# Altium PCB Mega2560_Custom.PcbDoc (part 5 of 5)
Units mil, origin at the board's own origin, x right, y up, seen from the top; angles counter-clockwise.
Board outline 4724.41 x 2992.13 mil, 2 copper layers (Top Layer, Bottom Layer), stack 57 mil thick; 197 components, 130 nets, 758 pads, 836 vias.
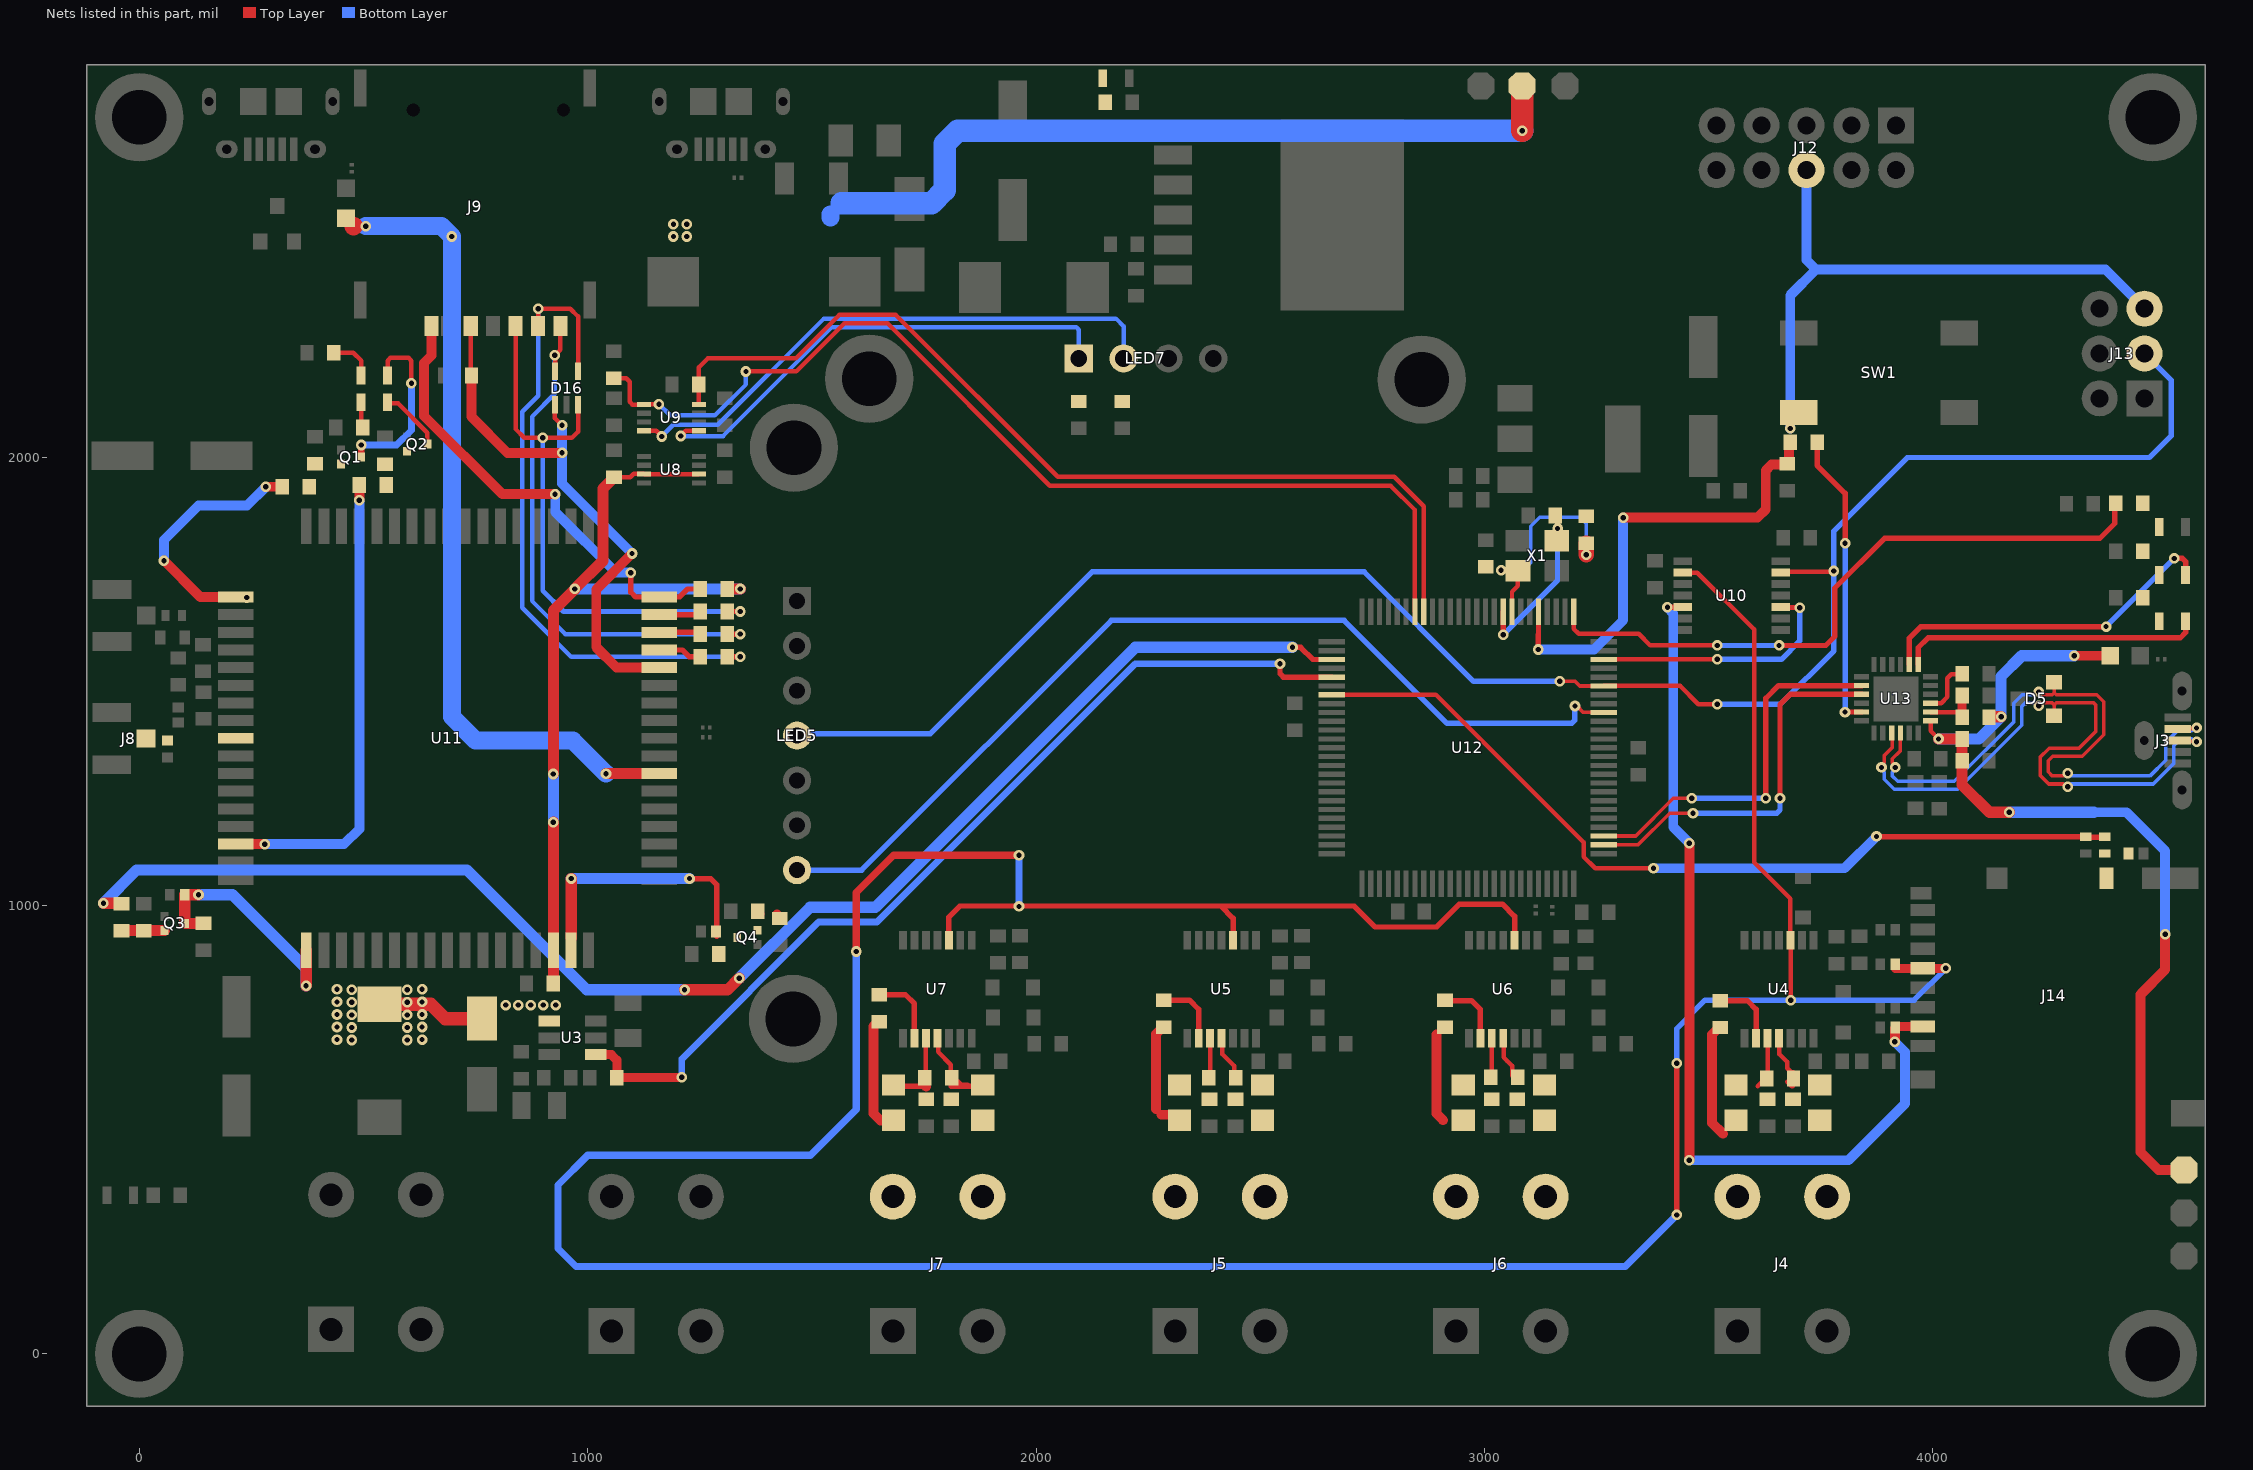
[diagram p3: the nets of this part, all layers, seen from the top]

## Via types
v1: diameter 23.62, hole 11.81, Top Layer to Bottom Layer, 836 vias

## Nets (pads, with @x,y where several pads share a name; then routed paths per layer and width w, separated by ;. In a path a pad name is that pad's centre, name@x,y a point inside that pad or via, vN(x,y) a via of type N, cw(c..) or ccw(c..) an arc to the next point about the centre after c; other vN are vias at no path point) (continued)
NetLED2_1: LED2.1 R7.1
NetLED3_1: LED3.1 R25.1 | length 101.4
  Top Layer w10: R25.1@434,2233 477,2233 494.77,2215.23 LED3.1@494.77,2181.95
NetLED3_2: LED3.2 Q1.3 | length 398.9
  Top Layer w10: LED3.2@553.82,2181.95 553.82,2215.14 559.68,2221 600.96,2221 606.82,2215.14 v1(606.82,2164.95)
  Top Layer w15: Q1.3@494.64,2000 494.82,2000.18 494.82,2026.82 v1(495,2027)
  Bottom Layer w15: v1(495,2027) 573.87,2027 606.82,2059.95 v1(606.82,2164.95)
NetLED4_1: LED4.1 R26.1 | length 55.9
  Top Layer w10: R26.1@494.77,2066 LED4.1@494.77,2121.95
NetLED4_2: LED4.2 Q2.3 | length 160.9
  Top Layer w10: LED4.2@549.82,2121.95 LED4.2@550.82,2120.95 ; LED4.2@553.82,2121.95 555.74,2120.04 576.96,2120.04 642.46,2054.54 642.46,2046.31 ; Q2.3@642.46,2028.95 Q2.3@642.46,2029 ; Q2.3@642.46,2029 642.46,2046.31 ; Q2.3@642.46,2029 642.46,2046.31
NetLED6_1: LED6.1 R41.1
NetLED8_1: LED8.1 R45.1
NetLED9_1: LED9.1 R46.1
NETLIGHT: R27.2 U11.52 | length 552.5
  Top Layer w22: v1(55,1769) 136.05,1687.95 U11.52@214.82,1687.95 ; v1(282.26,1933.95) R27.2@318.82,1933.95
  Bottom Layer w22: v1(55,1769) 55.31,1769.31 55.31,1815.31 132,1892 240.31,1892 v1(282.26,1933.95)
  other v1: 239.77,1686.72 239.77,1686.72
NetQ1_2: Q1.2 R27.1 R28.1
NetQ2_2: Q2.2 R29.1 R30.1
NetQ3_2: Q3.2 R31.1 R32.1 | length 96.5
  Top Layer w25: R31.1@-39.82,943.95 -39.57,944.2 Q3.2@56.54,944.2
NetQ4_2: Q4.2 R33.1 R34.1 | length 15.1
  Top Layer w20: R33.1@1379,987 1379,986 R33.1@1384,981 ; R34.1@1422,981 R34.1@1427,976
NetR10_2: R10.2 U4.2 | length 164.2
  Top Layer w12: R10.2@3526.87,787.95 3585.87,787.95 3605.5,768.31 U4.2@3605.5,690.91
NetR11_2: R11.2 U5.2 | length 163.8
  Top Layer w12: R11.2@2284.82,788.95 2342,788.95 2362.64,768.31 U5.2@2362.64,690.91
NetR16_2: R16.2 U6.2 | length 164.2
  Top Layer w12: R16.2@2911.87,787.95 2970.87,787.95 2990.5,768.31 U6.2@2990.5,690.91
NetR17_2: R17.2 U7.2 | length 164.2
  Top Layer w12: R17.2@1649.82,800.95 1708.82,800.95 1728.46,781.31 U7.2@1728.46,703.91
NetR21_2: R21.2 U11.33 | length 94.4
  Top Layer w10: R21.2@1244.14,1648.58 R21.2@1251.18,1655.62
  Top Layer w12: U11.33@1159.7,1648.58 R21.2@1244.14,1648.58
NetR22_2: R22.2 U11.32 | length 93.1
  Top Layer w10: R22.2@1247.25,1609.21 R22.2@1251.18,1605.28
  Top Layer w12: U11.32@1159.7,1609.21 R22.2@1247.25,1609.21
NetR23_2: R23.2 U11.31 | length 97.6
  Top Layer w12: U11.31@1159.7,1569.84 1211.16,1569.84 1226.05,1554.95 R23.2@1251.18,1554.95
NetR42_1: R42.1 R43.1 U13.8 | length 118.9
  Top Layer w10: U13.8@3994.59,1431.42 4065,1431.42 R42.1@4065,1420
  Top Layer w20: R42.1@4065,1431.42 R43.1@4065,1468.5
NetR44_2: R44.2 U13.9 | length 122.3
  Top Layer w10: U13.9@3994.59,1451.11 3994.76,1451.28 4018.28,1451.28 4032,1465 4032,1507 4040.86,1515.86 4063.86,1515.86 R44.2@4065,1517
NRESET: C40.2 D19.2 Q4.3 U11.16 | length 578.2
  Top Layer w12: v1(1227,1060) 1274,1060 1288,1046 D19.2@1288,931.02
  Top Layer w25: U11.16@963.15,927.42 v1@963.15,1060
  Bottom Layer w25: v1@963.15,1060 v1(1227,1060)
  other v1: 963,1060
PB7: R41.2 U12.26 | length 1473.6
  Top Layer w10: U12.26@3199.04,1654.95 3199.04,1616.73 3209.82,1605.95 3343.82,1605.95 3369.82,1579.95 v1(3518.82,1579.95)
  Top Layer w12: v1(3656.82,1579.95) 3760.95,1579.95 3781,1600 3781,1708 3891.95,1818.95 4371.95,1818.95 4405.48,1852.48 4405.48,1886.48 R41.2@4408,1889
  Bottom Layer w12: v1(3518.82,1579.95) v1(3656.82,1579.95)
PRGM_DTR: C44.1 U13.23 | length 667.9
  Top Layer w12: C44.1@3741.82,2032.95 3741.82,1981.18 3804,1919 v1(3804,1808) ; v1@3800.29,1431.42 U13.23@3841.05,1431.42
  Bottom Layer w12: v1@3804,1431.6 v1(3804,1808)
  other v1: 3803.82,1431.42
PRGM_RX: U12.3 U13.20 | length 845.2
  Top Layer w8: U12.3@3265.97,1154.95 3336.95,1154.95 3420.95,1238.95 v1(3461.82,1238.95)
  Top Layer w12: v1(3627.14,1238.95) 3627.14,1462.1 3655.51,1490.48 U13.20@3841.05,1490.48
  Bottom Layer w12: v1@3461.82,1239.95 3462.32,1239.45 3626.64,1239.45 v1(3627.14,1238.95)
PRGM_TX: U12.2 U13.21 | length 851.7
  Top Layer w8: U12.2@3265.97,1135.26 3342.26,1135.26 3412.95,1205.95 v1(3464.82,1205.95)
  Top Layer w12: v1(3658.82,1238.95) 3658.82,1447.95 3681.67,1470.79 U13.21@3841.05,1470.79
  Bottom Layer w12: v1(3464.82,1205.95) 3651.79,1205.95 3658.82,1212.98 v1(3658.82,1238.95)
PWR12V_EN: R3.2 U3.4 U12.55 | length 2119.5
  Top Layer w12: v1(2543.82,1538.95) 2543.82,1516.95 2551.49,1509.28 U12.55@2659.67,1509.28
  Top Layer w15: R3.2@1065,616 R3.2@1067,614
  Top Layer w20: U3.4@1017.57,667.6 1017.73,667.44 1052.56,667.44 1065,655 R3.2@1065,616 ; R3.2@1067,614 1067.5,614 1070,616.5 1209.5,616.5 v1(1210,617)
  Bottom Layer w15: v1(1210,617) 1210,658 1515.04,963.04 1644.92,963.04 2220.82,1538.95 v1(2543.82,1538.95)
PWRKEY: C41.2 D20.2 Q3.3 U11.1 | length 562.9
  Top Layer w25: v1(132,1024) 101.23,1024 D20.2@101.18,1023.95 101.18,960.59 Q3.3@101.82,959.95 142.95,959.95 C41.2@143,960 ; v1(372,821) 372.3,821.3 U11.1@372.3,900.55
  Bottom Layer w25: v1(132,1024) 208,1024 372,860 v1(372,821)
PWRKEY_EN: R31.2 U12.53 | length 3249.3
  Top Layer w12: v1(2571.82,1575.95) 2571.9,1575.87 2589.9,1575.87 2617.12,1548.65 U12.53@2659.67,1548.65
  Top Layer w25: v1(-80,1005) -40.87,1005 R31.2@-39.82,1003.95 ; v1(1216,812) 1312,812 v1(1338,838)
  Bottom Layer w25: v1(-80,1005) -6,1079 731,1079 998,812 v1(1216,812) ; v1(1338,838) 1496,996 1641.24,996 2221.19,1575.95 v1(2571.82,1575.95)
R\E\S\E\T\: C44.2 J12.6 J13.5 R38.1 SW1.3 U12.30 | length 2391.5
  Top Layer w8: U12.30@3120.06,1654.71 U12.30@3120.3,1654.95
  Top Layer w12: v1(3119.82,1570.95) 3120.06,1571.19 3120.06,1603.8 3120.3,1604.04 U12.30@3120.3,1631.42
  Top Layer w22: v1(3309,1865) 3608.87,1865 3627,1883.13 3627,1970.38 3639.89,1983.27 3665.82,1983.27 3679.32,1996.77 C44.2@3679.32,2023.97 ; C44.2@3678.41,2029.54 C44.2@3681.82,2032.95
  Bottom Layer w22: v1(3119.82,1570.95) 3243.95,1570.95 3309,1636 v1(3309,1865) ; v1@3681.82,2064 3681.82,2097.95 3681.82,2360.95 3738.93,2418.06 ; J12.6@3717.82,2639.95 3717.82,2439.16 3738.93,2418.06 ; J13.5@4471.82,2330.95 4384.71,2418.06 3738.93,2418.06
  other v1: 3681.82,2063.95
RF_ANT: D22.1 J8.1 U11.60
RST_LCD: LED5.7 U12.17 | length 2166.1
  Top Layer w8: v1(3201.82,1444.95) 3206.05,1444.95 3220.46,1430.54 U12.17@3265.97,1430.54
  Bottom Layer w12: LED5.7@1465.82,1082.95 LED5.7@1466.82,1082.95 ; LED5.7@1466.82,1078.95 1610.82,1078.95 2167.82,1635.95 2687.05,1635.95 2916.63,1406.37 3194.21,1406.37 3201.24,1413.4 3201.24,1444.37 v1(3201.82,1444.95)
RXLED: LED9.2 U13.13 | length 675.3
  Top Layer w12: U13.13@3967.17,1537.85 3967.17,1575.17 3989,1597 4551.5,1597 4563.53,1609.03 LED9.2@4563.53,1634
  Top Layer w16: LED9.2@4561.69,1632.16 LED9.2@4563.53,1634
SCK: J13.3 LED5.4 U10.13 U12.20 | length 4074.3
  Top Layer w8: v1(3167.82,1499.95) 3201.82,1499.95 3212.18,1489.59 U12.20@3265.97,1489.59
  Top Layer w10: U12.20@3265.97,1489.59 3436.18,1489.59 3476.82,1448.95 v1(3518.82,1448.95) ; U10.13@3660.07,1742.13 3661.98,1744.04 3780.91,1744.04 v1@3782.82,1745.95
  Bottom Layer w12: LED5.4@1465.82,1382.95 1763.82,1382.95 2124.82,1743.95 2731.79,1743.95 2975.79,1499.95 v1(3167.82,1499.95) ; v1(3518.82,1448.95) 3659.82,1448.95 3778.82,1567.95 3778.82,1834.74 3943.08,1999 4482.87,1999 4531.82,2047.95 4531.82,2170.95 J13.3@4471.82,2230.95
  other v1: 3778.82,1745.95
SCK_3.3V: D27.1 J14.5 U4.10 U5.10 U6.10 U7.10 U10.2 | length 8243.5
  Top Layer w10: U10.2@3441.57,1742.13 3474.64,1742.13 3601,1615.77 3601,1096.15 3682.27,1014.88 U4.10@3682.27,922.41 3683,921.68 v1(3683,789)
  Top Layer w12: U7.10@1805.23,909.41 U7.10@1805.23,922.41 1805.23,974.36 1829.82,998.95 1961.82,998.95 2411.82,998.95 ; U5.10@2439.41,909.41 U5.10@2439.41,922.41 2439.41,971.36 2411.82,998.95 ; U6.10@3067.27,909.41 U6.10@3067.27,922.41 3067.27,975.73 3040,1003 2944,1003 2893,952 2756,952 2709.05,998.95 2411.82,998.95 ; v1(3428.82,309.95) v1(3428.82,647.95)
  Top Layer w16: v1(1598.82,897.51) 1598.82,1028.95 1681.82,1111.95 v1(1961.82,1111.95)
  Top Layer w20: D27.1@3916.74,859.96 J14.5@3977.52,859.97 v1(4028.82,859.95)
  Bottom Layer w12: v1(3428.82,647.95) 3428.82,725.82 3492,789 v1(3683,789) 3957.87,789 v1(4028.82,859.95)
  Bottom Layer w16: v1(1598.82,897.51) 1598.82,544.89 1496.88,442.95 999.88,442.95 933.82,376.89 933.82,234.95 973.82,194.95 3313.82,194.95 v1(3428.82,309.95) ; v1(1961.82,997.95) v1(1961.82,1111.95)
SCL_3.3V: LED7.1 R36.1 U9.5 | length 1099.8
  Top Layer w10: v1(1207.5,2046.95) 1218.97,2058.42 U9.5@1247.85,2058.42
  Bottom Layer w10: v1(1207.5,2046.95) 1301.82,2046.95 1544.82,2289.95 2089.14,2289.95 2095,2284.09 LED7.1@2095,2220
SCL_5V: R40.1 U9.8 U12.43 | length 2159.5
  Top Layer w10: U9.8@1247.85,2117.48 1247.85,2161.85 R40.1@1248,2162 1248,2200 1267.91,2219.91 1463.91,2219.91 1561,2317 1687,2317 2048,1956 2798.61,1956 2864.4,1890.21 U12.43@2864.4,1654.95
SD_CS: U10.10 U12.23 | length 570.5
  Top Layer w10: U12.23@3265.97,1548.65 v1@3518.12,1548.65
  Top Layer w12: U10.10@3660.07,1665.36 3660.78,1664.65 3702.12,1664.65 v1(3702.82,1663.95)
  Bottom Layer w12: v1(3518.82,1548.95) 3661.82,1548.95 3702.82,1589.95 v1(3702.82,1663.95)
SD_CS_3.3V: D25.1 J14.2 U10.5 | length 2055
  Top Layer w12: v1(3407.82,1664.95) 3408.03,1665.15 3441.37,1665.15 U10.5@3441.57,1665.36
  Top Layer w20: D25.1@3920.95,730.05 J14.2@3977.52,730.05
  Top Layer w22: v1(3456.82,431.95) v1(3456.82,1138.81) ; v1(3915,696) D25.1@3915,726.27
  Bottom Layer w22: v1(3407.82,1664.95) 3407.82,1664.51 3420.82,1651.51 3420.82,1174.81 v1(3456.82,1138.81) ; v1(3456.82,431.95) 3811.95,431.95 3938,558 3938,673 v1(3915,696)
SD_DET: D29.1 J14.SW-A R47.1
SDA_3.3V: LED7.2 R37.1 U9.4 | length 1262.7
  Top Layer w10: U9.4@1125.8,2058.42 1152.85,2058.42 1165,2046.27 v1(1165,2046)
  Bottom Layer w10: v1(1165,2046) 1165,2046.44 1190.51,2071.95 1289.82,2071.95 1526.82,2308.95 2178.05,2308.95 2195,2292 LED7.2@2195,2220
SDA_5V: R39.1 U9.1 U12.44 | length 2348.5
  Top Layer w10: R39.1@1058,2176 1086,2176 1094,2168 1094,2123.07 1099.86,2117.21 U9.1@1125.8,2117.21 ; U9.1@1126.27,2117.95 v1(1158.82,2117.95) ; v1(1352.82,2190.95) 1464.95,2190.95 1571.95,2297.95 1668.98,2297.95 2030.61,1936.32 2790.45,1936.32 2844.71,1882.06 U12.44@2844.71,1654.95
  Bottom Layer w10: v1(1158.82,2117.95) 1183.82,2092.95 1283.82,2092.95 1352.82,2161.95 v1(1352.82,2190.95)
SDMMC_DET: R47.2 R48.1 U12.57 | length 1932.5
  Top Layer w10: U12.57@2659.67,1470.17 2891.6,1470.17 3220.82,1140.95 3220.82,1108.95 3246.82,1082.95 v1(3376.82,1082.95)
  Top Layer w12: v1(3874,1154) 3874.37,1153.63 4339.78,1153.63 4340.96,1152.45 R47.2@4382.96,1152.45
  Bottom Layer w22: v1(3376.82,1082.95) 3802.95,1082.95 v1(3874,1154)
SIM_CLK: D16.5 J9.C3 R22.1 | length 1199.5
  Top Layer w10: v1(926.82,2226.95) 926.82,2227.31 939.13,2239.62 J9.C3@939.13,2292.45 ; D16.5@927.23,2191.35 v1@927.23,2226.95
  Top Layer w12: R22.1@1311.18,1605.28 v1(1340.38,1605.28)
  Bottom Layer w10: v1(926.82,2226.95) 926.82,2140.95 875.82,2089.95 875.82,1679.18 949.72,1605.28 v1(1340.38,1605.28)
SIM_DATA: D16.4 J9.C7 R23.1 | length 1498.7
  Top Layer w10: J9.C7@889.82,2293.15 v1(889.82,2330.95) 961.05,2330.95 978.41,2313.59 D16.4@978.41,2191.35
  Top Layer w12: R23.1@1311.18,1554.95 v1(1340.38,1554.95)
  Bottom Layer w10: v1(889.82,2330.95) 889.82,2136.95 853.82,2100.95 853.82,1663.95 962.82,1554.95 v1(1340.38,1554.95)
SIM_DET: J9.CD R24.2 U11.34 | length 1047.2
  Top Layer w12: v1(1096,1742.31) 1096,1699 1107.05,1687.95 U11.34@1159.7,1687.95 1204.95,1687.95 1222.95,1705.95 R24.2@1251.18,1705.95
  Top Layer w22: J9.CD@651.73,2292.45 651.73,2226.85 635,2210.13 635,2091.7 809.3,1917.4 v1(927.27,1917.4)
  Bottom Layer w22: v1(927.27,1917.4) 927.58,1917.09 927.58,1877.42 1062.69,1742.31 v1(1096,1742.31)
SIM_RST: D16.3 J9.C2 R21.1 | length 1272.9
  Top Layer w10: J9.C2@839.13,2292.45 839.13,2062.64 858.82,2042.95 v1(899.82,2042.95) 964.82,2042.95 978.41,2056.54 D16.3@978.41,2116.55
  Top Layer w12: R21.1@1311.18,1655.62 v1(1340.38,1655.62)
  Bottom Layer w10: v1(899.82,2042.95) 899.82,1701.95 924.39,1677.39
  Bottom Layer w12: 924.39,1677.39 946.16,1655.62 v1(1340.38,1655.62)
SIM_VDD: C34.2 D16.1 J9.C1 U11.30 | length 1243.1
  Top Layer w10: J9.C1@739.13,2292.45 739.13,2183.64 C34.2@740.82,2181.95 ; D16.1@927.23,2116.55 927.03,2116.34 927.03,2086.74 v1(942.82,2070.95)
  Top Layer w22: C34.2@740.82,2181.95 740.82,2089.95 821.32,2009.45 v1(942.82,2009.45) ; v1(1099,1785) 1019,1705 1019,1576 1064.53,1530.47 U11.30@1159.7,1530.47
  Bottom Layer w22: v1(942.82,2070.95) v1(942.82,2009.45) 942.82,1941.18 v1(1099,1785)
STATUS: R29.2 U11.66 | length 1057.2
  Top Layer w22: U11.66@214.82,1136.77 v1(280,1136.77) ; v1(490.82,1903.95) R29.2@490.82,1937.95
  Bottom Layer w22: v1(280,1136.77) 456.64,1136.77 490.82,1170.95 v1(490.82,1903.95)
SW_12V: D6.2 L1.1 U3.1 | length 279.7
  Top Layer w30: L1.1@535.82,779.93 650.07,779.93 682.31,747.69 D6.2@763.82,747.69 763.82,735.46 D6.2@782.29,717
  other v1: 474,700 597.65,700 441,701 630.65,701 474,728 597.65,728 441,729 630.65,729 474,756 597.65,756 441,757 630.65,757 817,778 845,778 873,778 901,778 929,778 474,784 597.65,784 441,785 630.65,785 474,812 597.65,812 441,813 630.65,813
TH1_CON+: FB3.1 J4.4 | length 2.8
  Top Layer w40: FB3.1@3747.82,520.95 FB3.1@3748.82,519.95 ; J4.4@3762.82,351.95 J4.4@3763.82,350.95
TH1_CON-: FB2.1 J4.2 R10.1 | length 256.1
  Top Layer w22: R10.1@3525.82,727.95 3523.32,727.95 3507.42,712.05 3507.42,515.22 3531.64,491
TH1_T+: C15.2 C17.1 FB3.2 U4.4 | length 124.1
  Top Layer w10: U4.4@3657.67,689.92 3657.67,668.33 3674.91,651.09 3674.91,636.95 3683.88,627.97 3688,627.97 3680.05,627.97 3680.05,616.46 C15.2@3687.89,608.62 ; C15.2@3675.32,606.95 3685.32,596.95 C15.2@3687.82,596.95
TH1_T-: C11.2 C15.1 FB2.2 U4.3 | length 103.2
  Top Layer w10: 3608.87,596.91 3631.09,619.13 U4.3@3631.09,690.91
TH2_CON+: FB7.1 J6.4
TH2_CON-: FB6.1 J6.2 R16.1 | length 200
  Top Layer w22: 2892.62,535.95 2892.62,712.63 ; 2893,535.95 2907.7,521.25 ; R16.1@2909.32,728.95 R16.1@2911.82,728.95
TH2_T+: C25.2 C27.1 FB7.2 U6.4 | length 93.8
  Top Layer w10: U6.4@3042.67,689.92 3042.67,661.15 3050.66,653.16 3061.56,642.25 3061.56,619.95 C25.2@3072.89,608.62
TH2_T-: C23.2 C25.1 FB6.2 U6.3 | length 73.9
  Top Layer w10: C25.1@3016.09,617 U6.3@3016.09,690.91
TH3_CON+: FB5.1 J5.4 | length 4.8
  Top Layer w40: J5.4@2504.82,354.35 J5.4@2508.22,350.95
TH3_CON-: FB4.1 J5.2 R11.1 | length 249.7
  Top Layer w22: 2267,546.18 2267,713.63 2282.32,728.95 R11.1@2284.82,728.95 ; 2279.89,533.29 2304.84,533.29 2316.12,522 FB4.1@2316.12,521.25
  Top Layer w40: J5.2@2308.22,350.95 J5.2@2319.82,362.55
TH3_T+: C16.2 C18.1 FB5.2 U5.4 | length 88.1
  Top Layer w10: U5.4@2414.8,689.92 2415.08,689.65 2415.08,668.78 2441.57,642.29 2441.57,623.43 C16.2@2449,616
TH3_T-: C14.2 C16.1 FB4.2 U5.3 | length 88.2
  Top Layer w10: U5.3@2388.23,703.91 2388.23,616.77 C16.1@2389,616
TH4_CON+: FB9.1 J7.4 | length 0.6
  Top Layer w40: J7.4@1880.42,350.95 J7.4@1880.62,351.15 ; FB9.1@1880.62,520.75 FB9.1@1880.82,520.95
TH4_CON-: FB8.1 J7.2 R17.1 | length 263.4
  Top Layer w22: 1637.02,548.81 1637.02,535.95 1652.72,520.25 FB8.1@1681.12,520.25 ; 1637,548.84 1637,730.63 1647.32,740.95 R17.1@1649.82,740.95
  Top Layer w40: J7.2@1680.42,350.95 J7.2@1681.12,351.65
TH4_T+: C26.2 C28.1 FB9.2 U7.4 | length 199.4
  Top Layer w8: FB9.2@1878.08,596.95 FB9.2@1880.82,599.69
  Top Layer w10: U7.4@1779.64,690.91 1781.24,689.31 1781.24,673.76 1809.86,645.14 1809.86,618.14 C26.2@1812,616 1812,598.13 1810.82,596.95 ; C26.2@1824.99,608.62 1833.66,599.95 1847.8,599.95
  Top Layer w12: 1810.82,596.95 1841.82,596.95 ; 1847.8,596.95 FB9.2@1878.08,596.95
TH4_T-: C24.2 C26.1 FB8.2 U7.3 | length 136.9
  Top Layer w10: C26.1@1754.05,616 U7.3@1754.05,690.91
  Top Layer w12: FB8.2@1681.82,596.95 1741.82,596.95
  Top Layer w22: 1753.41,597.36 1754.82,595.95
TXLED: LED8.2 U13.14 | length 781.3
  Top Layer w12: U13.14@3947.35,1537.72 3947.35,1596.35 3973,1622 v1(4386,1622) ; v1(4538,1774) 4556.5,1774 4563.53,1766.97 LED8.2@4563.53,1737
  Bottom Layer w12: v1(4386,1622) v1(4538,1774)
USB_D_N: D5.2 J3.2 U13.4 | length 1389.1
  Top Layer w8: 3909.51,1318.49 3909.51,1327.07 3926.82,1344.38 3926.82,1383.33 U13.4@3927.67,1384.18 ; v1(4235.82,1476.26) 4240.05,1476.26 4246.36,1469.95 4265.51,1469.95 4270.19,1474.63 ; D5.2@4270.19,1498.35 4270.19,1474.63 ; v1(4300.82,1295.26) 4296.6,1295.26 4290.28,1288.95 4265.82,1288.95 4256.82,1297.95 4256.82,1322.95 4266.82,1332.95 4333.28,1332.95 4380.82,1380.49 4380.82,1454.72 4365.59,1469.95 4274.88,1469.95 4270.19,1474.63 ; J3.2@4545.82,1393.54 4547.08,1394.8 4586.56,1394.8 v1(4587.82,1396.05)
  Bottom Layer w8: v1(3915.82,1307.95) 3915.82,1303.72 3909.51,1297.41 3909.51,1288.82 3921.39,1276.95 4047.82,1276.95 4180,1409.13 4180,1451.13 4198.82,1469.95 4225.28,1469.95 ; v1@4308.35,1288.95 4483.82,1288.95 4518.82,1323.95 4518.82,1363.4 4545.16,1389.74 4577.28,1389.74 4583.6,1396.05 v1(4587.82,1396.05)
USB_D_P: D5.1 J3.3 U13.3 | length 1418.9
  Top Layer w8: 3891.51,1318.49 3891.51,1334.53 3908.82,1351.84 3908.82,1383.33 U13.3@3907.98,1384.18 ; v1(4235.82,1445.64) 4240.05,1445.64 4246.36,1451.95 4265.51,1451.95 4270.19,1447.26 ; D5.1@4270.19,1423.55 4270.19,1447.26 ; v1(4300.82,1264.64) 4296.6,1264.64 4290.28,1270.95 4258.37,1270.95 4238.82,1290.49 4238.82,1330.4 4259.37,1350.95 4325.82,1350.95 4362.82,1387.95 4362.82,1447.26 4358.14,1451.95 4274.88,1451.95 4270.19,1447.26 ; J3.3@4545.82,1367.95 4547.08,1366.69 4586.56,1366.69 v1(4587.82,1365.43)
  Bottom Layer w8: v1(3885.2,1307.95) 3885.2,1303.72 3891.51,1297.41 3891.51,1281.37 3913.93,1258.95 4055.28,1258.95 4198,1401.67 4198,1443.67 4206.28,1451.95 4225.28,1451.95 ; v1@4308.35,1270.95 4491.28,1270.95 4536.82,1316.49 4536.82,1355.95 4552.62,1371.74 4577.28,1371.74 4583.6,1365.43 v1(4587.82,1365.43)
USB_PRGM: C49.1 C50.1 F3.2 P3.1 R42.2 U13.7 | length 2064.7
  Top Layer w10: U13.7@3994.59,1411.74 3994.59,1389.41 v1(4012.5,1371.5)
  Top Layer w22: v1@4315.03,1556.97 F3.2@4395.36,1556.95 ; 4462.82,801.77 4462.82,449.95 4502.82,409.95 P3.1@4559.82,409.95 ; 4463.31,801.77 4463.62,801.77 4464.36,802.52 4464.36,803.31 4517.82,856.77 v1(4517.82,935.95)
  Top Layer w25: v1(4012.5,1371.5) C49.1@4065,1371.5 C50.1@4065,1323 4065,1269 4126,1208 v1(4170,1208) ; R42.2@4125,1420 4126,1421 v1(4152,1421)
  Bottom Layer w22: 4359,1208 4432,1208 4517.82,1122.18 v1(4517.82,935.95)
  Bottom Layer w25: v1(4012.5,1371.5) 4102.5,1371.5 v1(4152,1421) 4152,1511 4198,1557 v1(4315,1557) ; v1(4170,1208) 4359,1208
USB_VBUS: F2.2 P2.1 U11.24 | length 3541.9
  Top Layer w22: v1(1040.82,1293.95) v1@1040.97,1294.1 ; U11.24@1159.55,1294.1 U11.24@1159.7,1294.25
  Top Layer w25: v1@1040.97,1294.1 U11.24@1159.55,1294.1
  Top Layer w40: F2.2@478,2514 F2.2@479,2515
  Top Layer w50: v1(3083.82,2727.95) P2.1@3083.82,2827.95
  Bottom Layer w40: v1(505,2515) 674,2515 v1(697,2492) 697,1421 750,1368 966.77,1368 v1(1040.82,1293.95) ; 1541.5,2534.5 1541.5,2541.5
  Bottom Layer w50: 1566,2566 1766.71,2566 1796,2595.29 1796,2698.66 1825.29,2727.95 v1(3083.82,2727.95)
  other v1: 1191.18,2491.95 1221,2491.95 1191.18,2519 1221,2519
VDD_EXT: C29.1 C35.2 R24.1 U8.3 U8.6 U11.15 | length 1775.6
  Top Layer w10: C29.1@1058.82,1954.95 1094.82,1954.95 1102.46,1962.58 1125.32,1962.58 U8.3@1125.8,1962.11 U8.6@1247.85,1962.11
  Top Layer w25: C35.2@923.48,826 U11.15@923.48,900.55 v1(923.48,1185.61) ; v1(923.48,1293.29) 923.48,1657.48 v1@971,1705 ; v1(971,1705.95) 1033.82,1768.77 1033.82,1929.95 1053.82,1949.95 1053.82,1952.45 1056.32,1954.95 C29.1@1058.82,1954.95 ; R24.1@1311.18,1705.95 v1(1340.38,1705.95)
  Bottom Layer w25: v1(923.48,1185.61) v1(923.48,1293.29) ; v1@971.95,1705.95 v1(1340.38,1705.95)
XTAL1: C42.2 R35.2 U12.34 X1.1 | length 338.1
  Top Layer w12: U12.34@3041.56,1654.95 3041.66,1654.85 3041.66,1604.11 v1(3041.82,1603.95)
  Bottom Layer w12: v1(3041.82,1603.95) 3162.82,1724.95 3162.82,1809.95 v1(3162.82,1840.82)
XTAL2: C43.1 R35.1 U12.33 X1.3 | length 485.3
  Top Layer w10: U12.33@3061.25,1654.95 3061.25,1699.54 3074.52,1712.81 X1.3@3074.52,1746.48
  Top Layer w35: v1(3227,1782) R35.1@3227,1808
  Bottom Layer w8: v1(3036.82,1747.95) 3085.82,1747.95 3102.82,1764.95 3102.82,1845.82 3123,1866 3213,1866 3227,1852 v1(3227,1782)
pads on no net: J1.2 J1.3 J1.4 J2.4 J3.4 J4.1 J4.3 J5.1 J5.3 J6.1 J6.3 J7.1 J7.3 J9.C6 J9.MH J11.1 J11.3 J12.7 J12.8 J14.1 J14.8 J15.1 J15.3 SW1.2 SW1.4 U3.6 U4.6 U4.13 U5.6 U5.13 U6.6 U6.13 U7.6 U7.13 U10.6 U10. U11.3 U11.4 U11.5 U11.6 U11.7 U11.8 U11.11 U11.12 U11.13 U11.14 U11.19 U11.20 U11.21 U11.22 U11.23 U11.25 U11.26 U11.35 U11.36 U11.37 U11.38 U11.40 U11.41 U11.42 U11.43 U11.44 U11.47 U11.48 U11.49 U11.50 U11.51 U11.67 U11.68 U12.1 U12.4 U12.5 U12.6 U12.7 U12.8 U12.9 U12.12 U12.13 U12.14 U12.15 U12.18 U12.24 U12.25 U12.27 U12.28 U12.29 U12.35 U12.36 U12.37 U12.38 U12.39 U12.40 U12.41 U12.42 U12.47 U12.48 U12.49 U12.50 U12.51 U12.52 U12.58 U12.59 U12.60 U12.63 U12.64 U12.65 U12.66 U12.67 U12.68 U12.69 U12.70 U12.79 U12.82 U12.83 U12.84 U12.85 U12.86 U12.87 U12.88 U12.89 U12.94 U12.95 U13.1 U13.10 U13.11 U13.12 U13.15 U13.16 U13.17 U13.18 U13.19 U13.22 U13.24
copper on no net:
  other v1: 1214,559 4230.05,684.77 3943,1685 3943,1792 239.77,2622.72

## Polygon pours and split planes (outlines as drawn)
GND on Top Layer "c" (solid, remove dead copper, pour order 0): -61,-66 -61,2821 4566.82,2821 4566.82,-66
GND on Bottom Layer "GND_L02_P003" (solid, remove dead copper, pour order 3): -61,-66 -61,2821 4566.82,2821 4566.82,-66

## Other copper
Top Layer:
  rectangle net NetD7_1: 1507,2335 1764,2492
  rectangle net GND: 2195.82,2818.95 2296.82,2869.95
  rectangle net NetLED2_1: 2107,2767.95 2172.82,2869.95
  region net GSM_PWR: 2264,2812 2194,2812 2194,2768 2264,2768
  rectangle net 5V: 1856,2474 1981,2640
  rectangle net 5V: 1775,2474 1863,2687.52
  rectangle net 5V: 1855,2565 2036,2687.52
  rectangle net GND: 1816,2695.95 2070,2866.95
  rectangle net 5V: 1642,2656 1805,2743
  region net GND: 1927,2217 1927,2442.82 1822,2442.82 1822,2217
  rectangle net NetD7_1: 2040,2445 2106,2492
  rectangle net USB_VBUS: 437,2493 526,2556
  region net NetLED9_1: 4517,1610 4517,1704 4452,1704 4452,1610
  rectangle net GND: 4513,1435 4591,1580
  rectangle net NetJ13_2: 4309,2084 4421,2185
  rectangle net GND: 3865,710 3897,964
  rectangle net NetQ4_2: 1364,934 1451.18,1004.75
  rectangle net GND: 1364,892 1451,928.95
  rectangle net GND: 1211,872 1264,956
  rectangle net TH4_CON-: 1626,717 1673,757
  rectangle net TH3_CON-: 2256,705 2307,745
  rectangle net TH1_CON-: 3496.42,704 3548.17,744
  rectangle net 3.3V: 1841.82,633 1894.96,674
  rectangle net NetD15_2: 1848.14,679.95 1920.14,769.95
  rectangle net D\R\D\Y\4\: 1971,671 2015,771
  rectangle net 3.3V: 2476,633 2529.14,674
  rectangle net NetD11_2: 2481.14,679.95 2553.14,769.95
  rectangle net D\R\D\Y\3\: 2604,671 2648,771
  rectangle net TH2_CON-: 2881.62,705 2936,745
  rectangle net 3.3V: 3103.86,633 3157,674
  rectangle net NetD14_2: 3109,681 3181,771
  rectangle net D\R\D\Y\2\: 3231,671 3275,771
  rectangle net CS2: 3213,797 3270,841
  rectangle net GND: 3782.86,596.94 3888,621
  rectangle net GND: 3882,596.94 3928,672.94
  rectangle net TH1_T+: 3666.82,614 3709.18,641.95
  rectangle net TH2_T+: 3051.82,617 3092.86,635
  rectangle net TH4_T+: 1789.82,617.07 1830.86,635.07
  rectangle net TH3_T+: 2423.96,616 2465,634
  rectangle net SCK_3.3V: 3905,849.96 3939,883.96
  rectangle net GND: 2997.82,488.95 3093.82,543
  rectangle net GND: 2369,484.95 2465,524.95
  rectangle net SW_12V: 425,689 798,826
  rectangle net 5V: 388.18,427 685,647
  region net GND: 1189,806 1055,806 1055,744 1189,744
  rectangle net 5V: 1080,658 1161,693
  region net 5V: 1161,734 1055,734 1055,684 1161,684
  region net SW_12V: 943,793 788,793 788,728 943,728
  region net FB_12V: 920,597 920,681 881,681 881,597
  rectangle net GND: 933,516 1024,636
  rectangle net 12V: 700,621 827,649
  rectangle net FB_12V: 834,650 940,681
  rectangle net GND: 4459,1033 4594,1167
  rectangle net GND: 4412.82,1151 4594,1323.95
  rectangle net GSM_PWR: 352,2087 403,2285
  rectangle net GSM_PWR: 192,2067 453,2133
  rectangle net NRESET: 1275,872 1344,957
  rectangle net USB_PRGM: 3983.82,1360 4033,1418
  rectangle net NetD3_1: 4503,1409 4577,1428
  rectangle net GND: 1608,2526 1757.85,2642
  rectangle net GND: 3303,1336 3363,1372
  rectangle net 5V: 2526,1371 2597,1408
  region net 3.3V: 2334.18,2096.95 2063,2096.95 2063,2006 2334.18,2006
  rectangle net 3.3V: 2251,2039 2334.18,2269
  region net SDA_3.3V: 2232.82,2270 2157,2270 2157,2105 2232.82,2105
  region net SCL_3.3V: 2130.82,2270 2060,2270 2060,2105 2130.82,2105
  rectangle net 5V: 3649,1758.95 3693,1943
  region net NetLED8_1: 4517,1713 4517,1811 4452,1811 4452,1713
  rectangle net CP_VDD: 4386,1665 4425,1810
  rectangle net NetD3_1: 4440,1536 4505.67,1580
  rectangle net XTAL2: 3209.5,1792 3244.5,1828
  rectangle net XTAL1: 3133,1848 3248,1891.95
  rectangle net NetD2_1: 439,2577 485,2641
  rectangle net GND: 1144.82,2582 1332,2643
  rectangle net NetD1_1: 1409,2621 1462,2658
  rectangle net NetD1_1: 1337,2582 1462,2650
  rectangle net NetF1_2: 1522,2585 1596,2742
  rectangle net 5V: 1038,2219 1211,2317
  rectangle net 5V: 1281,2113 1332,2208
  rectangle net GSM_PWR: 2062,2319 2246,2390
  rectangle net NetD1_1: 1337,2613 1363,2723
  rectangle net GSM_PWR: 1053.82,2335 1252,2465.95
  rectangle net USB_VBUS: 680,2477 1237,2534
  rectangle net VDD_EXT: 1021,1920.95 1080.82,1976.95
  rectangle net 3.3V: 2962,1996 3303,2079
  rectangle net 5V: 2978.82,1904 3235,1984.95
  rectangle net GND: -106,1685 32,2176.71
  rectangle net GND: 78,677 352,790
  rectangle net 12V: 723,590 799,649
  rectangle net 3.3V: 3358.94,1757.95 3466.82,1797
  rectangle net 3.3V: 3259,1905.95 3525,2134
  rectangle net GSM_PWR: 100,1774 168,1901
  rectangle net NetD7_1: 2261,2574 2387,2636
  rectangle net 5V: 1423,1638 1511,1718
  rectangle net GSM_PWR: 100,1888 254,2134
  rectangle net 3.3V: 4293.82,1103.76 4354.82,1134.76
  rectangle net GND: 276,703 352,813
  rectangle net GND: 78,694 301,849.95
  rectangle net GND: 3000,2161 3557.82,2683.95
  rectangle net GND: 2769.82,2323.95 3031.82,2683.95
  region net GND: -61.18,409.95 -93.18,409.95 -93.18,329.95 -61.18,329.95
  region net NetLED1_1: 50,376 -23.18,376 -23.18,329.95 50,329.95
  rectangle net 5V: 679,420.95 865.82,510
  rectangle net 5V: 1124,2138 1211,2317
  region net GND: 1351.82,2089.95 1284.82,2089.95 1284.82,2051.95 1351.82,2051.95
  rectangle net GND: 4549.82,544.95 4591.82,1044.95
  rectangle net GND: 2445.82,2290 2821.82,2798.95
  rectangle net GND: 4412.82,1299.95 4496.82,1399.95
  rectangle net GND: 3545,1907.95 3603,2182.95
  rectangle net GND: 3000,2089.95 3235,2214.95
  rectangle net 3.3V: 3027.82,1995.95 3309.82,2070.95
  rectangle net 3.3V: 3109.04,898 3244,947
  rectangle net GND: 992.82,2115.95 1076.82,2146.95
  rectangle net GND: 992.82,2115.95 1027.82,2406.95
  rectangle net GND: 497.82,2360 1027.82,2406.95
  rectangle net GND: 347.82,2308.95 620,2406.95
  rectangle net GND: 982,2759 1831,2816.95
  rectangle net GND: 1144.82,2638.95 1255.82,2773.95
  rectangle net GND: 135.97,2640.95 250.82,2741.95
  region net GND: 538,2741.95 366.03,2741.95 366.03,2646 538,2646
  rectangle net GND: 135.97,2727.95 539,2816.95
  rectangle net 5V: 3226.82,1012.95 3337,1070
  rectangle net 5V: 3192.82,1012.95 3231.82,1077.95
  rectangle net NetLED6_1: 4453,1820 4515,1907
  rectangle net NetJ13_2: 4340,1873 4381,2175
  rectangle net GND: 3454.82,2161.52 3785.82,2534.95
  rectangle net TH1_CON+: 3718.42,298.95 3820,546.95
  rectangle net TH1_CON+: 3711.42,298.95 3736.42,405.95
  region net TH1_CON-: 3586.42,546.95 3496.42,546.95 3496.42,298.95 3586.42,298.95
  region net TH1_CON-: 3616.22,405.95 3578,405.95 3578,298.95 3616.22,298.95
  rectangle net TH2_CON+: 3104.62,298.95 3194.62,546.95
  rectangle net TH2_CON+: 3083.62,298.95 3108.62,405.95
  region net TH2_CON-: 2988.42,546.95 2881.62,546.95 2881.62,298.95 2988.42,298.95
  region net TH2_CON-: 2988.42,405.95 2963.42,405.95 2963.42,298.95 2988.42,298.95
  rectangle net TH4_CON+: 1849.02,298.95 1939.02,546.95
  rectangle net TH4_CON+: 1828.02,298.95 1853.02,405.95
  region net TH4_CON-: 1716.02,546.95 1626.02,546.95 1626.02,298.95 1716.02,298.95
  region net TH4_CON-: 1732.82,405.95 1707.82,405.95 1707.82,298.95 1732.82,298.95
  region net TH3_CON-: 2362.62,405.95 2337.62,405.95 2337.62,298.95 2362.62,298.95
  region net TH3_CON-: 2345.82,546.95 2255.82,546.95 2255.82,298.95 2345.82,298.95
  rectangle net TH3_CON+: 2457.82,298.95 2482.82,405.95
  rectangle net TH3_CON+: 2477.82,298.95 2567.82,545
  rectangle net 5V: 3597,1758.95 3682.82,1841.95
  region net GND: 2952.82,1984.95 2887,1984.95 2887,1788.95 2952.82,1788.95
  rectangle net XTAL2: 2984.82,1721.95 3102.82,1769.95
  rectangle net GND: 2900.82,1788.95 3102.21,1859
  rectangle net GND: 3097.82,1840.95 3115.82,1891.95
  rectangle net GND: 3046.21,1788.95 3102.21,1891.95
  rectangle net XTAL1: 3132.82,1788.95 3188.82,1891.95
  rectangle net 5V: 2978.82,1878 3038,1917.95
  rectangle net R\E\S\E\T\: 3649,2067.95 3783,2129.95
  rectangle net R\E\S\E\T\: 3649,1970 3703.82,2076.95
  rectangle net GND: 3824.82,1194.95 3856.82,1354.95
  rectangle net GND: 3824.82,1194.95 4034.82,1235.95
  rectangle net GND: 3611,490 3707,530
  region net TH1_T-: 3652.87,641.95 3531.87,641.95 3531.87,552.95 3652.87,552.95
  rectangle net TH1_T+: 3666.82,552.95 3776,624.95
  region net TH2_T-: 3037.87,637 2916.87,637 2916.87,553 3037.87,553
  rectangle net TH2_T+: 3051.82,553 3161,624.95
  region net TH3_T-: 2410,634 2289,634 2289,552 2410,552
  rectangle net TH3_T+: 2423.96,552 2536,624.95
  rectangle net TH4_T+: 1789.82,553 1907.82,624
  region net TH4_T-: 1775.82,637 1654.82,637 1654.82,553 1775.82,553
  rectangle net 3.3V: 2481.82,897 2612,948
  rectangle net GND: 1735.4,484.95 1831.4,524.95
  rectangle net 3.3V: 1847.82,894.95 2021,948
  rectangle net CP_VDD: 3941.82,1259.95 4036.82,1298.95
  rectangle net CP_VDD: 3994.82,1259.95 4036.82,1344.95
  rectangle net CP_VDD: 3941.82,1260.95 3973.82,1399.95
  rectangle net GND: 4118.82,1016.3 4166.82,1041.95
  rectangle net SD_DET: 4369,1037.17 4448,1135.98
  rectangle net 5V: 1270.67,1987 1326.82,2033.95
  rectangle net GSM_PWR: 534.82,2414 1093,2465.95
  region net GSM_PWR: 2073,2433 1992,2433 1992,2319 2073,2319
  rectangle net GND: 135.97,2803.95 1832,2866.95
  rectangle net GND: 1144.82,2638.95 1255.27,2699.95
  region net GND: 96.33,1279.95 96.33,1334.92 -104.67,1334.92 -104.67,1279.95
  rectangle net GND: -105.18,1408.95 -18.18,1609.95
  rectangle net GND: 989.82,770 1046.82,936.95
  rectangle net 12V: 700,522 873.82,632
  rectangle net 12V: 73,331 350.44,647
  rectangle net 3.3V: 3724.82,901 3856,951
  rectangle net GND: 555.82,1720.95 621.82,1885.95
  rectangle net GND: 46.82,1157.95 257.82,1347.95
  rectangle net GSM_PWR: 69,1475.95 176.82,1513
  rectangle net GSM_PWR: 170,1475.95 286.82,1587.95
  rectangle net GNSS_ANT: -10.18,1574 72.82,1666.95
  rectangle net RF_ANT: -5.18,1356.36 254.82,1388.36
  rectangle net NetC39_1: 79,1631.95 254.82,1663.95
  region net GND: 606.82,2030 606.82,2059.95 527.82,2059.95 527.82,2030
  region net NetQ2_2: 607.82,1914.95 607.82,2022 527.82,2022 527.82,1914.95
  region net NetQ1_2: 456.82,1910.95 456.82,1999 349.82,1999 349.82,1910.95
  region net NetLED4_2: 567.82,2097.95 567.82,2145.95 531.82,2145.95 531.82,2097.95
  rectangle net GSM_FB: 2200.82,2400.95 2244.82,2463.95
  rectangle net GSM_FB: 2200.82,2443.95 2354.82,2499.95
  pour cut-out: 40,1747 40,1259 -113,1259 -113,1747
  pour cut-out: 1122.46,2321.82 1325.23,2190.71 1462.29,2190.71 1668.46,2324.02 1668.46,2455.29 1467.95,2582.71 1319.54,2582.71 1122.46,2455.29
Bottom Layer:
  rectangle net 5V: 1852,2538 2388.68,2661.95
  rectangle net 5V: 1852,2629.95 2388.68,2694.95
  rectangle net GND: 1823,2197 1937,2271
  rectangle net SW_12V: 798,728 944,794
  rectangle net SW_12V: 425,689 810.47,826
  rectangle net 5V: 1066,658 1161,734
  rectangle net GND: 4536,1073 4595,1130
  rectangle net 5V: 3264,1808 3292,1895
  rectangle net GND: 290,704.95 331,812
  rectangle net GND: 982,2727 1255.82,2869.95
  rectangle net GND: 140,2789 447,2826
  rectangle net 5V: 2377,2626 3201,2695
  rectangle net 5V: 2146,2321 2388,2556
  rectangle net USB_VBUS: 1497,2478 1586,2593
  rectangle net USB_VBUS: 1169,2476 1577,2535
  rectangle net GND: 3539,1981 3613,2131
  rectangle net 3.3V: 2966,1996 3117,2079
  rectangle net 5V: 2958,1879 3292,1987
  rectangle net 5V: 3587,1758 3685,1847
  rectangle net GND: 3383,2218 3589,2344
  rectangle net GSM_PWR: 98,1774 167,1826
  rectangle net GSM_PWR: 211,2041 451.82,2135
  rectangle net NetD7_1: 1603,2443 2106,2499
  rectangle net 3.3V: 3385,1753 3500,2129
  rectangle net GND: 2835.58,2325 2984,2620
  rectangle net GSM_PWR: 101,1908 218,2135
  rectangle net GND: -99,1895 24,2101
  rectangle net 12V: 129.82,523.95 762.82,647
  rectangle net GND: 4527.82,1419.02 4591.24,1522.95
  rectangle net GND: 4445.82,1419.02 4591.24,1480
  region net GND: 4502.44,1432.58 4445.82,1432.58 4445.82,1324.95 4502.44,1324.95
  rectangle net 5V: 1058,2008 1087.82,2361
  rectangle net 5V: 1062.82,2008 1315.82,2029
  rectangle net GND: 2842.82,2325.95 3274.82,2484.95
  rectangle net GND: 2990,2088 3275.82,2484.95
  rectangle net GND: 1228.82,2744.95 1665.82,2869.95
  rectangle net GND: 2290.82,2760.95 2821.82,2869.95
  rectangle net 5V: 3723.82,2056.95 3839.82,2137.95
  rectangle net GND: 1611,2761 2071,2828.95
  rectangle net GSM_PWR: 363,2394 624.82,2477
  rectangle net GSM_PWR: 1169,2367 1238,2465.95
  rectangle net GSM_PWR: 1182.82,2367.95 2063,2437
  rectangle net 5V: 1062.82,2154.95 1282.82,2362
  rectangle net GND: 1553,2818.95 2296.82,2869.95
  rectangle net GND: 1160,2604 1751,2816.95
  rectangle net 12V: 35.82,291 496,528.95
  rectangle net 5V: 516,420.95 865.82,510.95
  rectangle net 12V: 742,523.95 839,649
  rectangle net GND: 81,704.95 294,850.95
  rectangle net 12V: 35.82,403.95 296.82,647
  rectangle net GSM_PWR: 356,2075.95 451.82,2477
  rectangle net GND: 346.82,1398 396.82,1620.95
  rectangle net GSM_PWR: 81.82,1471.95 329.82,1590.95
  pour cut-out: 1122.46,2321.82 1325.23,2190.71 1462.29,2190.71 1668.46,2324.02 1668.46,2455.29 1467.95,2582.71 1319.54,2582.71 1122.46,2455.29
  pour cut-out: 387,806 687,806 687,502 387,502
  pour cut-out: 40.82,1748 40.82,1260 -112.18,1260 -112.18,1748

## Silkscreen, mask and mechanical layers (free items; w line width, h text height)
Top Overlay:
  lines w6: 363.47,2075.47 375,2087 420,2087
  lines w8: 106,1392 116,1382 118,1380 118,1355 ; 2972,975 2989,958 3126.22,958 3142.9,974.68
  lines w10: 973,588 985,576 1065,576 1081,560 ; 1335,1591 1371,1591 1386,1576 1386,1466 1367,1447 1355,1447 ; 1335,1669.9 1371,1669.9 1386,1684.9 1386,1794.9 1365.9,1815 1343,1815 ; 1634,626 1634,643 1642,651 1719,651 1733,637 ; 1656.65,475 1719.65,475 1728.15,483.5 ; 1837.5,483.5 1846,475 1909,475 ; 2268.95,622 2268.95,639 2276.95,647 2355.82,647 2365.82,637 ; 2290.65,475 2353.65,475 2362.15,483.5 ; 2471.5,483.5 2480,475 2543,475 ; 2897.95,623 2897.95,640 2905.95,648 2984.82,648 2994.82,638 ; 2918.65,475 2981.65,475 2990.15,483.5 ; 3099.5,483.5 3108,475 3171,475 ; 3513.13,620 3513.13,637 3521.13,645 3600,645 3610,635 ; 3533.65,475 3596.65,475 3605.15,483.5 ; 3714.5,483.5 3723,475 3786,475 ; 4149,1406 4165,1390 4165,1339 ; 4153,1452 4182.45,1422.55 4182.45,1391.97 ; 4317,1192 4368,1192 4384,1176
  text "GSM_PWR" at 2248.12,2816 h55
  text "BOARD" at 1020.89,2695 h39.37
  text "POWER" at 1020.89,2660 h39.37
  text "5V" at 3204.82,2641.42 h60 r90
  text "VBUS" at 3109.82,2630.74 h60 r90
  text "GSM UPDATES" at 167.44,2613 h39.37
  text "GSM_PWR" at 3020.82,2504.7 h60 r90
  text "JTAG" at 3309.82,2461.95 h60
  text "NanoSIM" at 487.82,2213.95 h60
  text "NETLIGHT" at 227.26,2158 h55
  text "*" at 638,2150.52 h65
  text "*" at 1332,2103.52 h65
  text "*" at 1012,2101.52 h65
  text "STATUS" at 227.26,2101 h55
  text "RESET" at 3765.41,2014 h60
  text "*" at 3637,1999.52 h65
  text "ICSP HEADER" at 4223.82,1927.95 h60 r90
  text "*" at 2891,1925.52 h65
  text "*" at 3466,1893.52 h65
  text "*" at 1048,1889.52 h65
  text "*" at 1295,1889.52 h65
  text "*" at 3750,1787.52 h65
  text "TRANSMIT" at 4251.42,1716 h50
  text "*" at 3370,1643.52 h65
  text "RECEIVE" at 4287.74,1607 h50
  text "*" at 3332,1353.52 h65
  text "*" at 135,1350.52 h65
  text "*" at 4020,1338.52 h65
  text "*" at 2567,1326.52 h65
  text "PROG: HEADER" at 4423.82,1204 h60 r90
  text "*" at 3950,1150.52 h65
  text "D" at 4459,1140 h45
  text "D" at 3869,969 h45
  text "*" at 2762,954.52 h65
  text "*" at 3299,944.52 h65
  text "*" at 3167,933.52 h65
  text "*" at 1905,932.52 h65
  text "*" at 3778,930.52 h65
  text "*" at 2537,928.52 h65
  text "D" at 3871,890 h45
  text "*" at 1190,860.52 h65
  text "*" at 133,834.52 h65
  text "*" at 947,793.52 h65
  text "D" at 3840,756 h45
  text "D" at 3839,715 h45
  text "*" at 1819,631.52 h65
  text "*" at 2451,630.52 h65
  text "*" at 3079,630.52 h65
  text "*" at 3693,630.52 h65
  text "MICRO SD CARD" at 3967.5,472 h60
  text "12V" at 224.32,414.95 h59.06
  text "GND" at 466.82,414.95 h59.06
  text "ADC1" at 849.82,414.95 h59.06
  text "ADC0" at 1102.82,414.95 h59.06
  text "-TH4+" at 1477.82,411.95 h59.06
  text "-TH3+" at 2105.62,411.95 h59.06
  text "-TH2+" at 2733.42,411.95 h59.06
  text "-TH1+" at 3361.22,411.95 h59.06
  text "USB_PRGM" at 4215.64,380.95 h60
  text "3.3V" at 4373.29,288.95 h60
  text "12V" at -110.43,281 h55
  text "12V" at 4373.29,192.95 h60
  text "Note:" at 3935,1 h60
  text "* >> 0.1uF 0603" at 3930,-57 h60
  text "D >> D25 to D29" at 3929.85,-108.64 h60
Bottom Overlay:
  drawing of 3075 lines, arcs and shapes, not listed
  text "ZERO CARBON FOOTPRINT" at 2398,1296 h38
Dimension:
  lines w10: 1523.82,479.95 1523.82,1378.45
Board Outline:
  lines w10: -117.18,-117.18 -117.18,2874.95 4607.23,2874.95 4607.23,-117.18 -117.18,-117.18 ; 2245.03,-117.18 2245.03,-117.18

## Dimensions
4607.23,-117.18 to -117.18,-117.18 on Dimension
-117.18,2874.95 to -117.18,-117.18 on Dimension

## Text inside footprints (layer, text, board x,y; h text height)
J1: Top Overlay "Board Edge" at 1390.88,2858.69 h19.68 r180
J2: Top Overlay "Board Edge" at 386.88,2858.69 h19.68 r180
J9: Top Overlay "Board Edge" at 903.97,2825.14 h35 r180